# Altium PCB PCB.PcbDoc (part 8 of 10)
Units mm, origin at the board's own origin, x right, y up, seen from the top; angles counter-clockwise.
Board outline 100.5 x 147.95 mm, 6 copper layers (Top Layer, Layer 2 (GND), Layer 3, Layer 4, Layer 5 (AGND), Bottom Layer), stack 1.449 mm thick; 511 components, 297 nets, 1620 pads, 565 vias.
Unrouted connection lines stored in the file: 597.
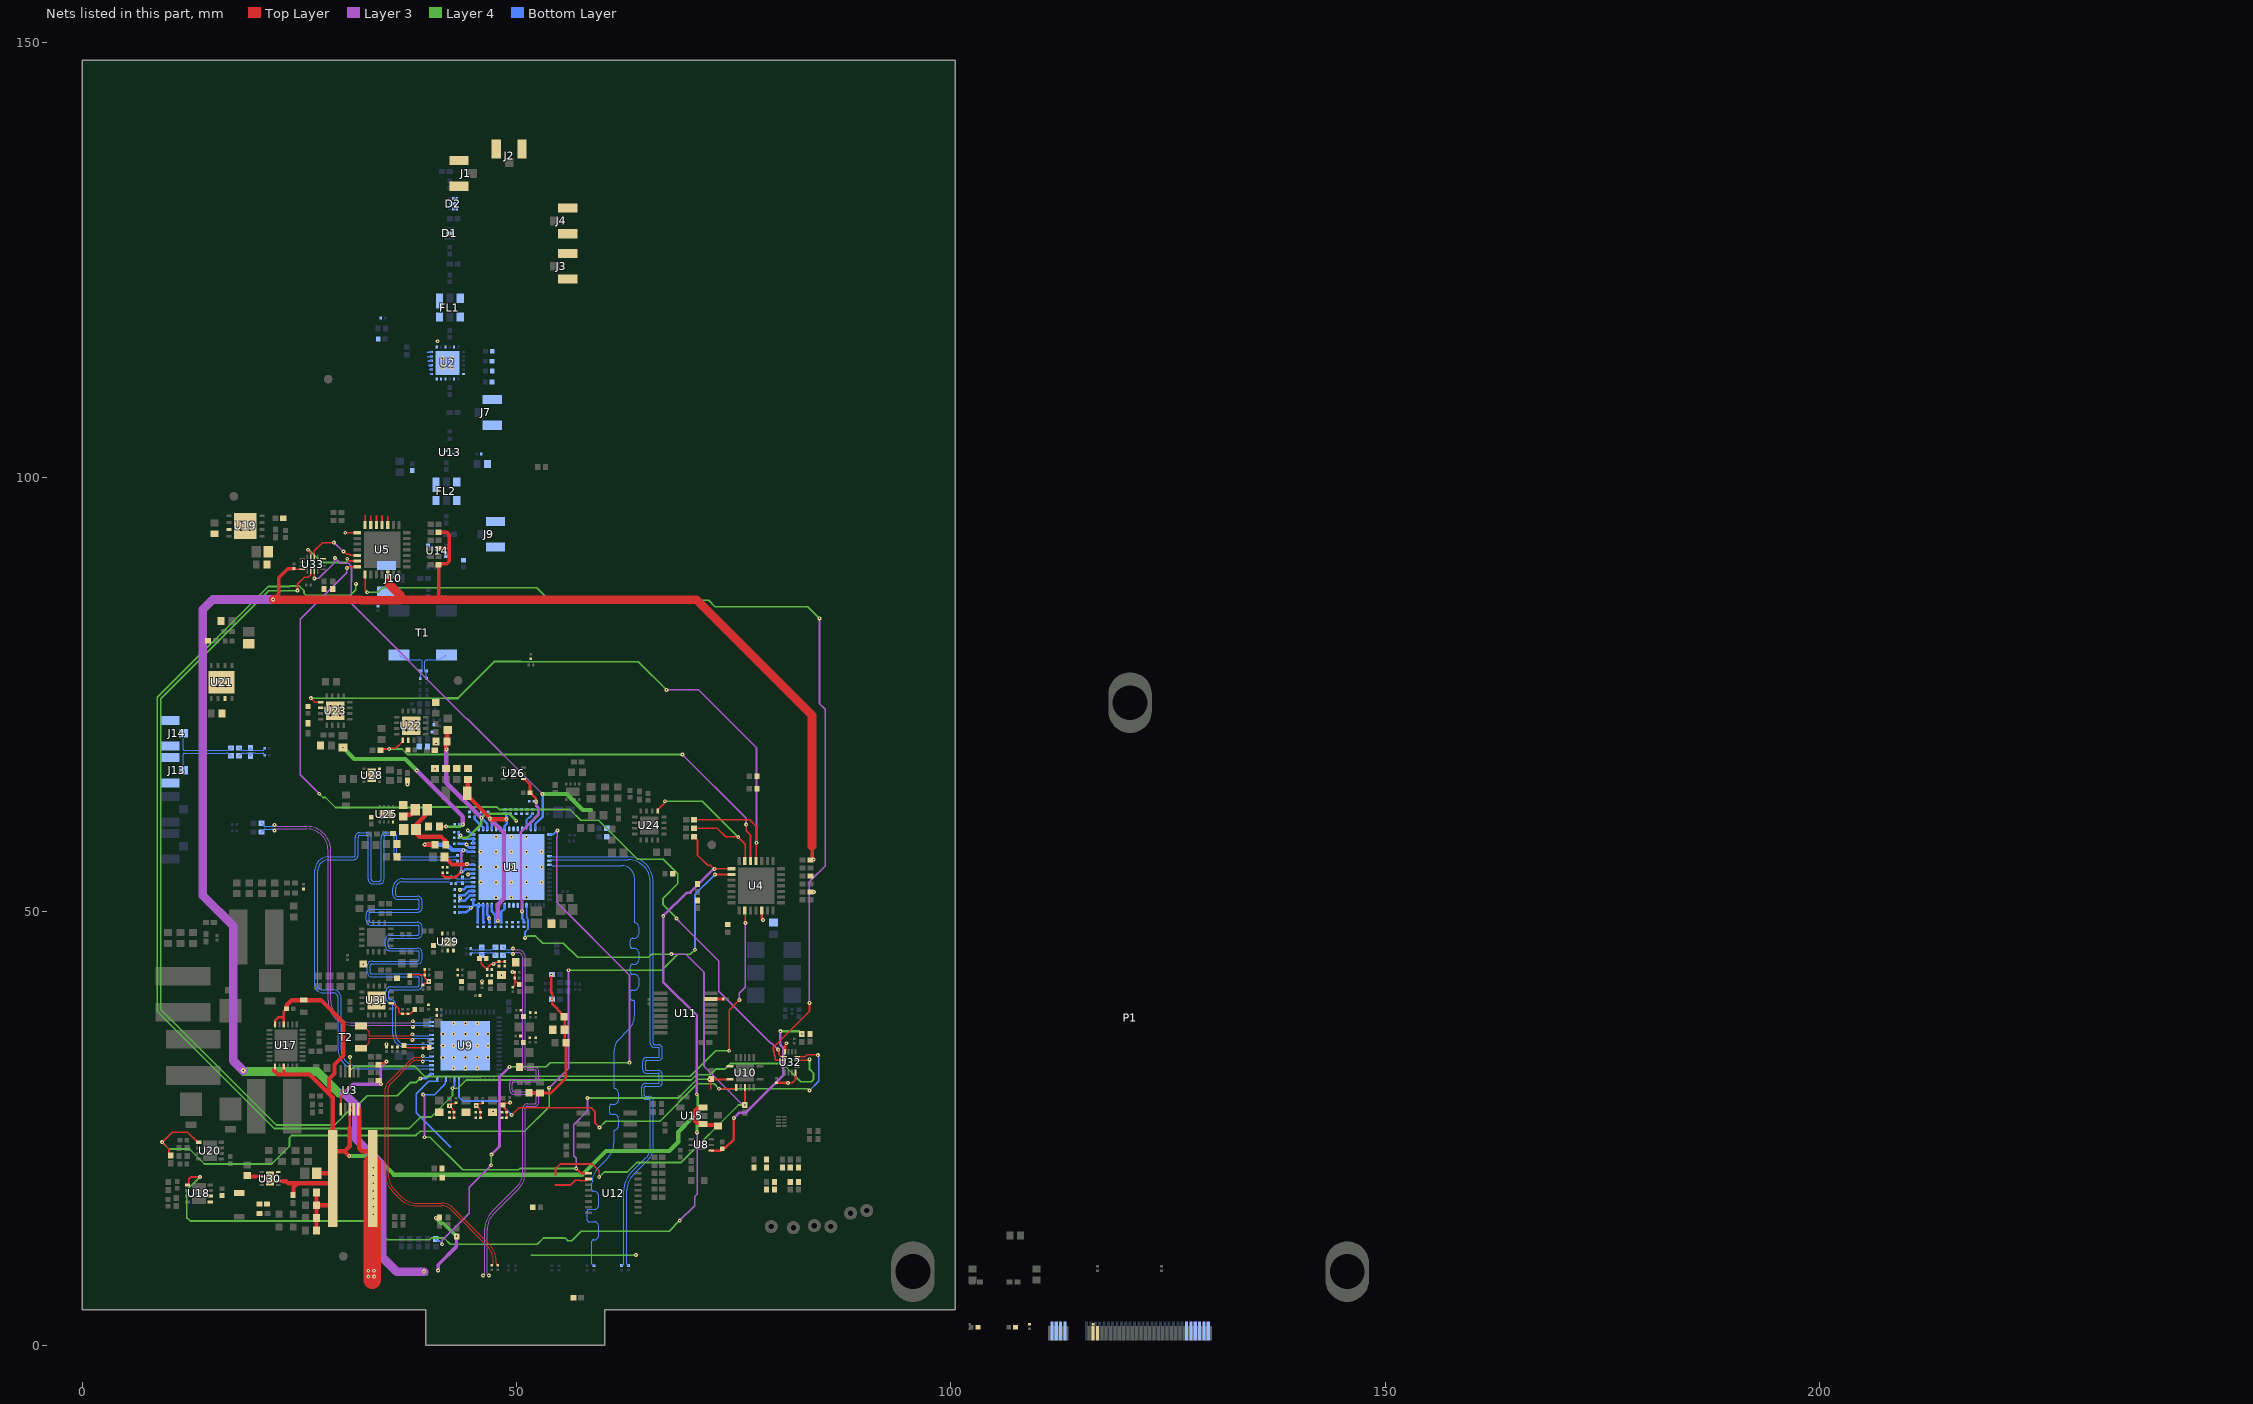
[diagram p5: the nets of this part, all layers, seen from the top]

## Via types
v1: diameter 0.45, hole 0.15, Top Layer to Bottom Layer, 432 vias
v2: diameter 0.5, hole 0.2, Top Layer to Bottom Layer, 132 vias
v3: diameter 0.6, hole 0.2, Top Layer to Bottom Layer, 1 vias

## Nets (pads, with @x,y where several pads share a name; then routed paths per layer and width w, separated by ;. In a path a pad name is that pad's centre, name@x,y a point inside that pad or via, vN(x,y) a via of type N, cw(c..) or ccw(c..) an arc to the next point about the centre after c; other vN are vias at no path point) (continued)
CLKin1_P: (continued)
  Layer 3 w0.097: v1(46.151,8.093) ccw(c46.151,8.212) 46.236,8.128 46.328,8.22 46.328,13.421 cw(c49.163,13.421) 47.158,15.425 49.978,18.245 ccw(c48.182,20.041) 50.722,20.041 50.722,27.366 cw(c51.223,27.366) 51.223,27.867 52.048,27.867 ccw(c52.048,28.071) 52.252,28.071 52.252,28.776 ccw(c52.048,28.776) 52.048,28.98 49.693,28.98 cw(c49.693,29.481) 49.192,29.481 49.192,30.187 cw(c49.693,30.187) 49.693,30.688 52.048,30.688 ccw(c52.048,30.892) 52.252,30.892 52.252,31.597 ccw(c52.048,31.597) 52.048,31.801 51.223,31.801 cw(c51.223,32.302) 50.722,32.302 50.722,44.672 ccw(c50.112,44.672) 50.112,45.282 50.005,45.282 ccw(c50.005,44.817) 49.676,45.146 cw(c49.579,45.243) v1(49.579,45.106)
  Bottom Layer w0.112: R96.1@48.447,44.973 ccw(c48.447,45.094) 48.532,45.009 48.605,45.081 cw(c49.071,44.615) 49.071,45.274 49.225,45.274 cw(c49.225,44.986) 49.429,45.19 49.467,45.152 ccw(c49.579,45.265) v1(49.579,45.106)
CLKout1_N: C185.1 U9.16 | length 67.6
  Bottom Layer w0.138: U9.16@40.211,31.802 ccw(c40.087,31.679) 40.087,31.854 39.95,31.854 cw(c39.95,31.905) 39.914,31.869 ccw(c39.878,31.832) 39.878,31.884 35.959,31.884 35.957,31.885 31.647,31.885 cw(c31.647,34.069) 29.462,34.069 29.462,40.013 ccw(c28.827,40.013) 28.827,40.648 27.659,40.648 cw(c27.659,41.544) 26.763,41.544 26.763,54.676 cw(c28.392,54.676) 28.392,56.306 31.211,56.306 ccw(c31.211,56.51) 31.415,56.51 31.415,58.558 cw(c31.957,58.558) 31.957,59.1 32.702,59.1 cw(c32.702,58.558) 33.244,58.558 33.244,53.716 ccw(c33.448,53.716) 33.448,53.512 34.193,53.512 ccw(c34.193,53.716) 34.397,53.716 34.397,58.558 cw(c34.939,58.558) 34.939,59.1 35.685,59.1 cw(c35.685,58.558) 36.226,58.558 36.226,56.51 ccw(c36.43,56.51) 36.43,56.306 42.857,56.306 ccw(c42.857,56.779) 43.192,56.444 C185.1@43.192,56.454
CLKout1_P: C183.1 U9.17 | length 66.5
  Bottom Layer w0.138: U9.17@40.211,32.302 cw(c40.087,32.426) 40.087,32.251 39.95,32.251 ccw(c39.95,32.2) 39.914,32.236 cw(c39.878,32.272) 39.878,32.221 36.098,32.221 36.097,32.223 31.647,32.223 cw(c31.647,34.069) 29.8,34.069 29.8,40.013 ccw(c28.827,40.013) 28.827,40.986 27.659,40.986 cw(c27.659,41.544) 27.1,41.544 27.1,54.194 27.1,54.676 cw(c28.392,54.676) 28.392,55.968 31.211,55.968 ccw(c31.211,56.51) 31.753,56.51 31.753,58.558 cw(c31.957,58.558) 31.957,58.762 32.702,58.762 cw(c32.702,58.558) 32.906,58.558 32.906,53.716 ccw(c33.448,53.716) 33.448,53.174 34.193,53.174 ccw(c34.193,53.716) 34.735,53.716 34.735,58.558 cw(c34.939,58.558) 34.939,58.762 35.685,58.762 cw(c35.685,58.558) 35.889,58.558 35.889,56.51 ccw(c36.43,56.51) 36.43,55.968 42.857,55.968 cw(c42.857,55.494) 43.192,55.829 C183.1@43.192,55.819
CLKout2_N: C187.1 U9.18 | length 34.5
  Top Layer w0.112: v1(39.19,32.727) cw(c39.19,32.887) 39.078,32.774 39.04,32.812 ccw(c38.836,32.608) 38.836,32.896 38.584,32.896 ccw(c38.584,32) 37.95,32.634 35.382,30.065 ccw(c35.816,29.632) 35.203,29.632 35.203,19.762 ccw(c37.743,19.762) 35.947,17.966 36.737,17.175 ccw(c38.533,18.972) 38.533,16.432 41.401,16.432 cw(c41.401,14.711) 42.618,15.927 46.805,11.74 cw(c44.79,9.725) 47.64,9.725 47.64,9.493 ccw(c47.8,9.493) C187.1@47.687,9.38 ; C187.1@47.687,9.38 ccw(c47.733,9.426) 47.733,9.361 C187.1@47.826,9.267
  Bottom Layer w0.112: v1(39.19,32.727) ccw(c39.19,32.887) 39.303,32.774 39.341,32.812 cw(c39.544,32.608) 39.544,32.896 39.871,32.896 cw(c39.871,32.736) 39.984,32.849 ccw(c40.097,32.963) 40.097,32.802 U9.18@40.211,32.802
CLKout2_P: C186.1 U9.19 | length 35
  Top Layer w0.112: v1(39.19,33.377) ccw(c39.19,33.218) 39.078,33.331 cw(c38.783,33.626) 38.783,33.209 38.52,33.209 ccw(c38.52,32.156) 37.775,32.9 35.16,30.285 ccw(c35.811,29.634) 34.89,29.634 34.89,19.761 ccw(c37.74,19.761) 35.725,17.746 36.517,16.954 ccw(c38.532,18.97) 38.532,16.119 41.4,16.119 cw(c41.4,14.709) 42.398,15.706 46.583,11.52 cw(c44.787,9.724) 47.327,9.724 47.327,9.493 cw(c47.168,9.493) 47.281,9.38 cw(c47.234,9.426) 47.234,9.361 C186.1@47.141,9.267
  Bottom Layer w0.112: v1(39.19,33.377) cw(c39.19,33.218) 39.303,33.331 39.341,33.293 ccw(c39.544,33.497) 39.544,33.209 39.871,33.209 ccw(c39.871,33.369) 39.984,33.256 cw(c40.097,33.142) 40.097,33.302 U9.19@40.211,33.302
CLKout3_N: C189.1 U9.21 | length 66.2
  Bottom Layer w0.138: 35.729,37.112 35.729,35.915 ccw(c37.26,35.915) 37.26,34.384 39.878,34.384 cw(c39.878,34.332) 39.914,34.369 ccw(c39.95,34.405) 39.95,34.354 40.087,34.354 cw(c40.087,34.179) U9.21@40.211,34.302 ; 35.729,37.15 35.729,39.292 ccw(c35.525,39.292) 35.525,39.496 35.492,39.496 cw(c35.492,40.038) 34.951,40.038 34.951,40.783 cw(c35.492,40.783) 35.492,41.325 38.573,41.325 ccw(c38.573,41.529) 38.777,41.529 38.777,42.274 ccw(c38.573,42.274) 38.573,42.478 33.352,42.478 cw(c33.352,43.02) 32.81,43.02 32.81,43.765 cw(c33.352,43.765) 33.352,44.307 38.573,44.307 ccw(c38.573,44.511) 38.777,44.511 38.777,45.257 ccw(c38.573,45.257) 38.573,45.461 35.443,45.461 cw(c35.443,46.002) 34.901,46.002 34.901,46.748 cw(c35.443,46.748) 35.443,47.289 38.573,47.289 ccw(c38.573,47.493) 38.777,47.493 38.777,48.239 ccw(c38.573,48.239) 38.573,48.443 33.222,48.443 cw(c33.222,48.984) 32.681,48.984 32.681,49.73 cw(c33.222,49.73) 33.222,50.272 34.898,50.272 38.573,50.272 ccw(c38.573,50.476) 38.777,50.476 38.777,51.221 ccw(c38.573,51.221) 38.573,51.425 36.27,51.425 cw(c36.27,51.967) 35.729,51.967 35.729,52.619 cw(c36.888,52.619) 36.888,53.778 42.319,53.778 42.399,53.859 42.399,53.909 C189.1@42.48,53.99
CLKout3_P: C188.1 U9.22 | length 65.2
  Bottom Layer w0.138: U9.22@40.211,34.802 cw(c40.087,34.926) 40.087,34.751 39.95,34.751 ccw(c39.95,34.7) 39.914,34.736 cw(c39.878,34.772) 39.878,34.721 37.26,34.721 cw(c37.26,35.915) 36.066,35.915 36.066,39.292 ccw(c35.525,39.292) 35.525,39.834 35.492,39.834 cw(c35.492,40.038) 35.288,40.038 35.288,40.783 cw(c35.492,40.783) 35.492,40.987 38.573,40.987 ccw(c38.573,41.529) 39.114,41.529 39.114,42.274 ccw(c38.573,42.274) 38.573,42.816 33.352,42.816 cw(c33.352,43.02) 33.148,43.02 33.148,43.765 cw(c33.352,43.765) 33.352,43.969 38.573,43.969 ccw(c38.573,44.511) 39.114,44.511 39.114,45.257 ccw(c38.573,45.257) 38.573,45.798 35.443,45.798 cw(c35.443,46.002) 35.239,46.002 35.239,46.748 cw(c35.443,46.748) 35.443,46.952 38.573,46.952 ccw(c38.573,47.493) 39.114,47.493 39.114,48.239 ccw(c38.573,48.239) 38.573,48.78 33.222,48.78 cw(c33.222,48.984) 33.018,48.984 33.018,49.73 cw(c33.222,49.73) 33.222,49.934 38.573,49.934 ccw(c38.573,50.476) 39.114,50.476 39.114,51.221 ccw(c38.573,51.221) 38.573,51.763 36.27,51.763 cw(c36.27,51.967) 36.066,51.967 36.066,52.619 cw(c36.888,52.619) 36.888,53.441 42.319,53.441 42.399,53.36 42.399,53.31 C188.1@42.48,53.228
CLKout4_N: T2.3 U9.24 | length 9
  Top Layer w0.112: T2.3@32.071,36.823 32.391,36.823 33.027,36.187 33.027,35.775 33.093,35.709 36.046,35.709 ; 36.046,35.709 37.762,35.709 37.931,35.877 v1(37.997,35.877)
  Bottom Layer w0.112: v1(37.997,35.877) 38.165,35.709 39.937,35.709 40.031,35.802 U9.24@40.211,35.802
CLKout4_P: T2.1 U9.23 | length 9
  Top Layer w0.112: T2.1@32.071,34.283 32.391,34.283 33.027,34.919 33.027,35.331 33.093,35.397 35.916,35.397 ; 35.917,35.396 37.762,35.396 37.931,35.227 v1(37.997,35.227)
  Bottom Layer w0.112: v1(37.997,35.227) 38.165,35.396 39.937,35.396 40.031,35.302 U9.23@40.211,35.302
CLKout5_N: R98.1 U9.27 | length 40.3
  Layer 3 w0.097: v1(22.122,59.98) cw(c22.122,59.842) 22.219,59.939 ccw(c22.548,60.268) 22.548,59.803 25.852,59.803 cw(c25.852,57.064) 28.591,57.064 28.591,39.716 ccw(c31.106,39.716) 31.106,37.201 37.399,37.201 37.814,37.201 37.991,37.377 v1(38.047,37.377)
  Bottom Layer w0.112: R98.1@20.609,60.163 cw(c20.609,60.042) 20.694,60.127 20.888,59.934 cw(c20.852,59.898) 20.902,59.898 ccw(c20.953,59.898) 20.917,59.862 ccw(c21.04,59.985) 21.04,59.811 21.768,59.811 ccw(c21.768,60.099) 21.971,59.895 22.009,59.933 cw(c22.122,59.821) v1(22.122,59.98) ; v1@38.113,37.377 38.282,37.209 39.937,37.209 40.031,37.302 U9.27@40.211,37.302
CLKout5_P: R97.1 U9.26 | length 40.4
  Layer 3 w0.097: v1(22.122,59.33) ccw(c22.122,59.467) 22.219,59.37 cw(c22.548,59.041) 22.548,59.506 25.852,59.506 cw(c25.852,57.064) 28.294,57.064 28.294,39.716 ccw(c31.106,39.716) 31.106,36.904 37.276,36.904 ; 37.276,36.904 37.814,36.904 37.991,36.727 v1(38.047,36.727)
  Bottom Layer w0.112: R97.1@20.609,59.147 ccw(c20.609,59.267) 20.694,59.182 20.888,59.376 ccw(c20.852,59.411) 20.902,59.411 cw(c20.953,59.411) 20.917,59.447 cw(c21.04,59.324) 21.04,59.498 21.768,59.498 cw(c21.768,59.21) 21.971,59.414 22.009,59.376 ccw(c22.122,59.489) v1(22.122,59.33) ; v1(38.047,36.727) 38.113,36.727 38.282,36.896 39.937,36.896 40.031,36.802 U9.26@40.211,36.802
CMLout1_N: C15.1 U1.22 | length 65.6
  Bottom Layer w0.138: U1.22@53.787,56.372 53.924,56.372 cw(c53.924,56.233) 54.022,56.331 ccw(c54.12,56.429) 54.12,56.291 62.863,56.291 cw(c62.863,53.413) 65.741,53.413 65.741,34.823 ccw(c65.87,34.823) 65.87,34.694 66.296,34.694 cw(c66.296,34.227) 66.763,34.227 66.763,33.332 cw(c66.296,33.332) 66.296,32.865 64.97,32.865 ccw(c64.97,32.736) 64.841,32.736 64.841,31.841 ccw(c64.97,31.841) 64.97,31.712 66.296,31.712 cw(c66.296,31.245) 66.763,31.245 66.763,30.35 cw(c66.296,30.35) 66.296,29.883 64.848,29.883 ccw(c64.848,29.753) 64.719,29.753 64.719,28.859 ccw(c64.848,28.859) 64.848,28.729 65.274,28.729 cw(c65.274,28.262) 65.741,28.262 65.741,22.898 cw(c63.62,22.898) 65.12,21.398 63.404,19.682 ccw(c65.2,17.886) 62.66,17.886 62.66,10.678 62.651,10.669 62.651,9.466 ccw(c62.789,9.466) 62.691,9.369 62.705,9.356 ccw(c62.77,9.42) 62.77,9.329 cw(c62.77,9.237) C15.1@62.834,9.302 ; C15.1@62.834,9.302 C15.1@62.889,9.248
CMLout1_P: C16.1 U1.23 | length 65.1
  Bottom Layer w0.138: U1.23@53.787,55.872 53.924,55.872 ccw(c53.924,56.011) 54.022,55.913 cw(c54.12,55.815) 54.12,55.953 62.863,55.953 cw(c62.863,53.413) 65.403,53.413 65.403,34.823 ccw(c65.87,34.823) 65.87,34.356 66.296,34.356 cw(c66.296,34.227) 66.425,34.227 66.425,33.332 cw(c66.296,33.332) 66.296,33.203 64.97,33.203 ccw(c64.97,32.736) 64.503,32.736 64.503,31.841 ccw(c64.97,31.841) 64.97,31.374 66.296,31.374 cw(c66.296,31.245) 66.425,31.245 66.425,30.35 cw(c66.296,30.35) 66.296,30.22 64.848,30.22 ccw(c64.848,29.753) 64.381,29.753 64.381,28.859 ccw(c64.848,28.859) 64.848,28.392 65.274,28.392 cw(c65.274,28.262) 65.403,28.262 65.403,22.901 cw(c63.612,22.901) 64.879,21.634 63.164,19.919 ccw(c65.194,17.889) 62.323,17.889 62.323,10.817 62.313,10.808 62.313,9.466 cw(c62.176,9.466) 62.273,9.369 62.26,9.356 cw(c62.195,9.42) 62.195,9.329 ccw(c62.195,9.237) C16.1@62.13,9.302 ; C16.1@62.076,9.248 C16.1@62.13,9.302
CMLout2_N: C17.1 U1.24 | length 65.7
  Bottom Layer w0.138: U1.24@53.787,55.372 53.924,55.372 cw(c53.924,55.233) 54.022,55.331 ccw(c54.12,55.429) 54.12,55.291 62.104,55.291 cw(c62.104,53.813) 63.582,53.813 63.582,48.732 cw(c63.48,48.124) 64.096,48.124 64.096,47.527 cw(c63.48,47.527) 63.48,46.911 63.346,46.911 ccw(c63.346,46.633) 63.068,46.633 63.068,46.036 ccw(c63.346,46.036) 63.346,45.758 63.48,45.758 cw(c63.48,45.142) 64.096,45.142 64.096,44.545 cw(c63.48,44.545) 63.48,43.929 63.346,43.929 ccw(c63.346,43.651) 63.068,43.651 63.068,43.054 ccw(c63.346,43.054) 63.346,42.776 63.48,42.776 cw(c63.48,42.159) 64.096,42.159 64.096,41.563 cw(c63.48,41.563) 63.48,40.947 63.346,40.947 ccw(c63.346,40.668) 63.068,40.668 63.068,40.072 ccw(c63.346,40.072) 63.346,39.793 cw(c63.346,39.558) 63.582,39.558 63.582,38.115 ; C17.1@58.901,9.242 58.846,9.296 ccw(c58.782,9.231) 58.782,9.323 cw(c58.782,9.414) 58.717,9.35 58.704,9.363 cw(c58.801,9.46) 58.663,9.46 58.663,10.78 58.672,10.789 58.672,12.031 cw(c58.853,12.031) 58.853,12.211 58.923,12.211 ccw(c58.923,12.729) 59.44,12.729 59.44,13.776 ccw(c58.923,13.776) 58.923,14.294 58.315,14.294 cw(c58.315,14.474) 58.135,14.474 58.135,15.521 cw(c58.315,15.521) 58.315,15.702 58.923,15.702 ccw(c58.923,16.219) 59.44,16.219 59.44,17.267 ccw(c58.923,17.267) 58.923,17.784 58.853,17.784 cw(c58.853,17.965) 58.672,17.965 58.672,18.725 cw(c61.212,18.725) 59.416,20.521 60.379,21.483 ccw(c58.348,23.514) 61.22,23.514 61.22,24.829 ccw(c61.192,25.37) 61.734,25.37 61.734,26.115 ccw(c61.192,26.115) 61.192,26.657 60.909,26.657 cw(c60.909,26.861) 60.705,26.861 60.705,27.607 cw(c60.909,27.607) 60.909,27.811 61.192,27.811 ccw(c61.192,28.352) 61.734,28.352 61.734,29.098 ccw(c61.192,29.098) 61.22,29.639 61.22,34.051 cw(c62.832,34.051) 61.692,35.191 62.878,36.377 ccw(c61.178,38.077) 63.582,38.077